# Altium PCB IndoorGuide_Tag_Device_V1.0.0.PcbDoc (part 1 of 2)
Units mil, origin at the board's own origin, x right, y up, seen from the top; angles counter-clockwise.
Board outline 2362.2 x 3661.42 mil, 4 copper layers (Top Layer, Ground, Power, Bottom Layer), stack 62.449 mil thick; 137 components, 86 nets, 438 pads, 206 vias.
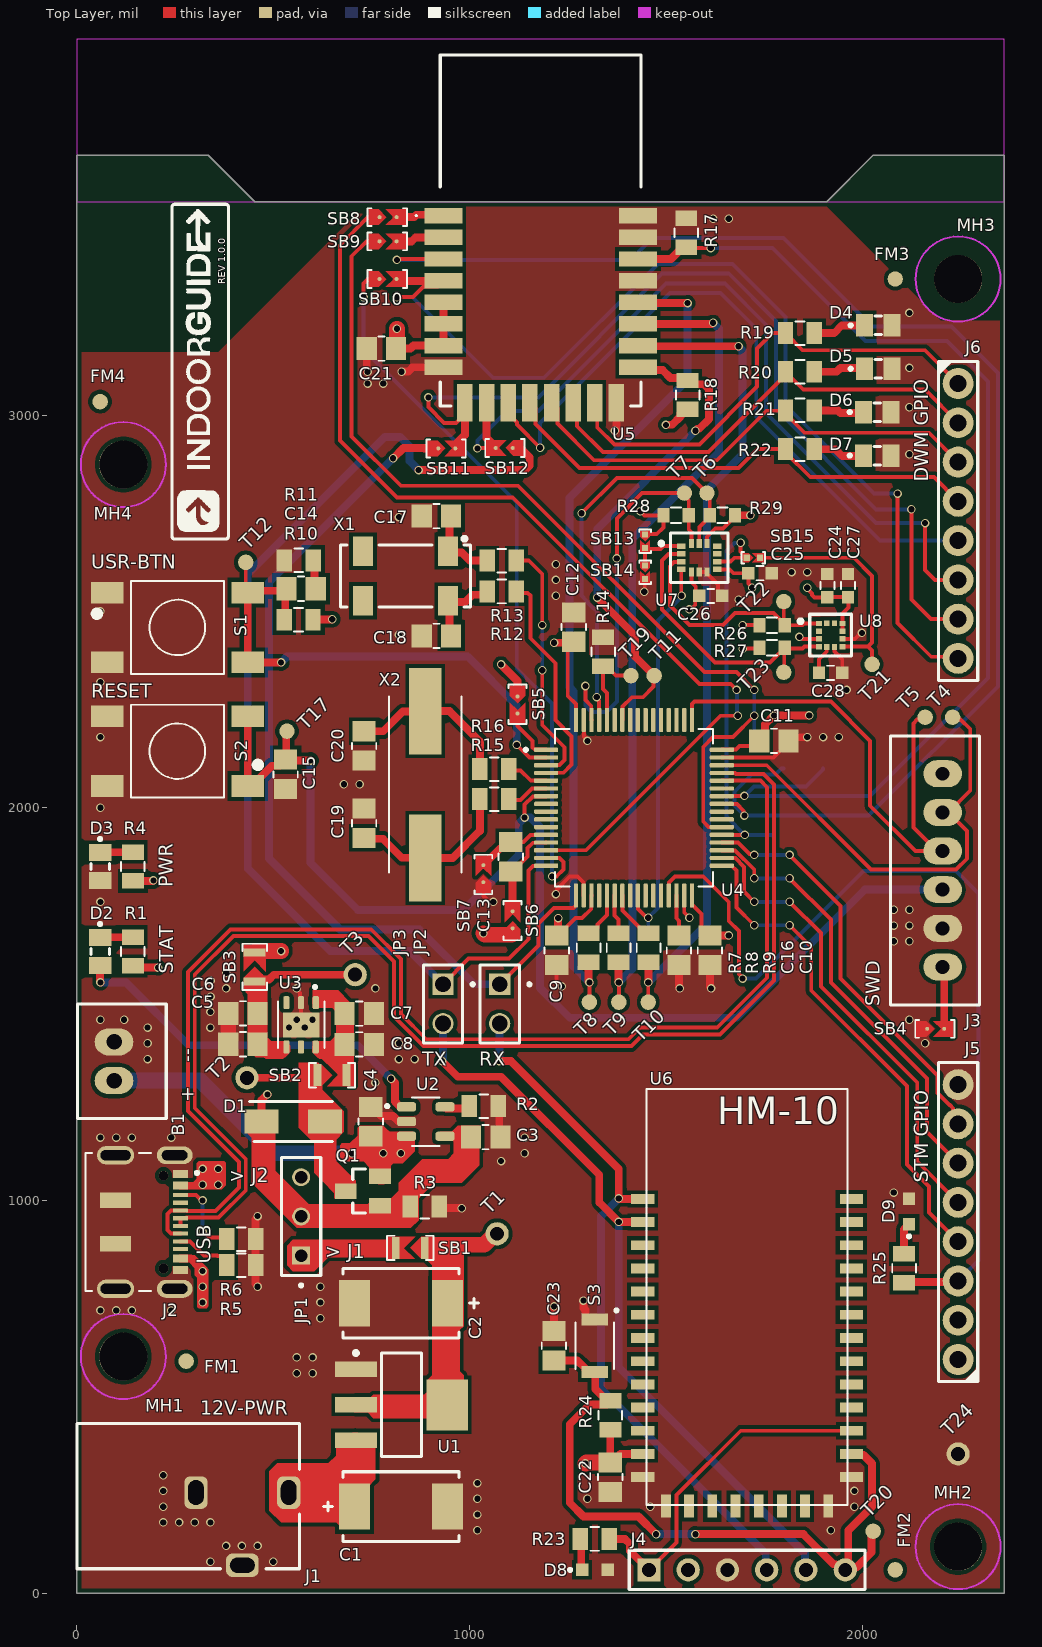
[diagram p0: Top Layer view]
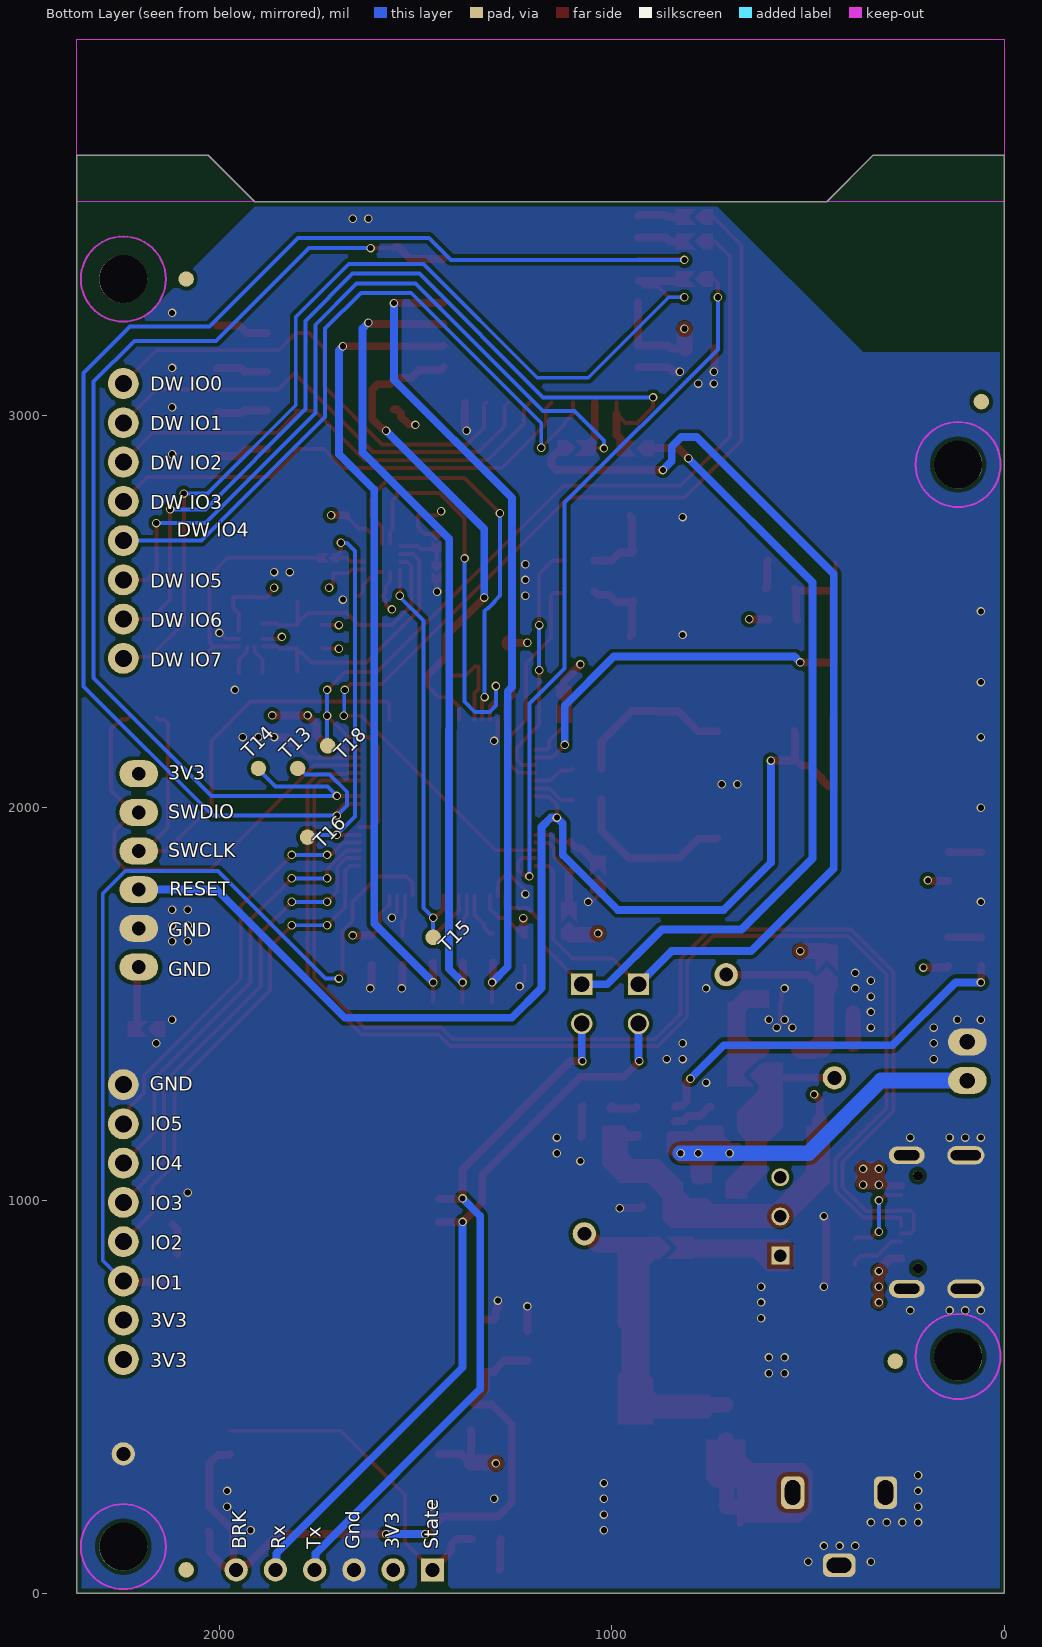
[diagram p1: Bottom Layer view, seen from below]
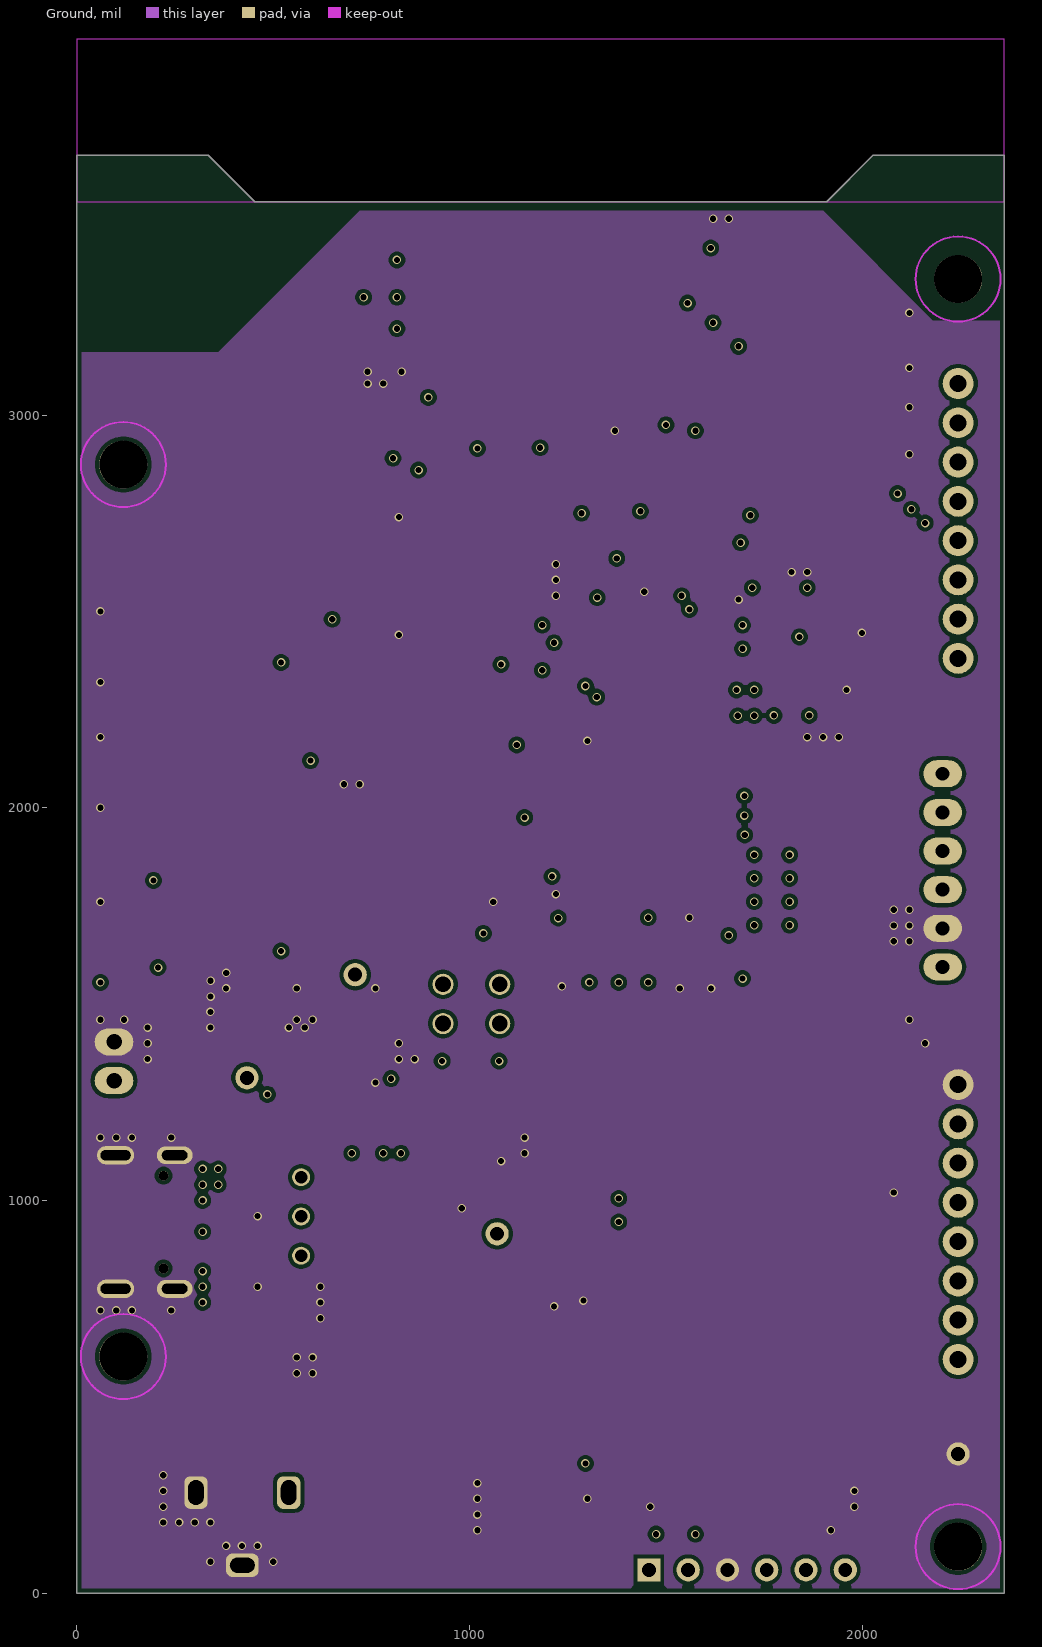
[diagram p2: Ground]
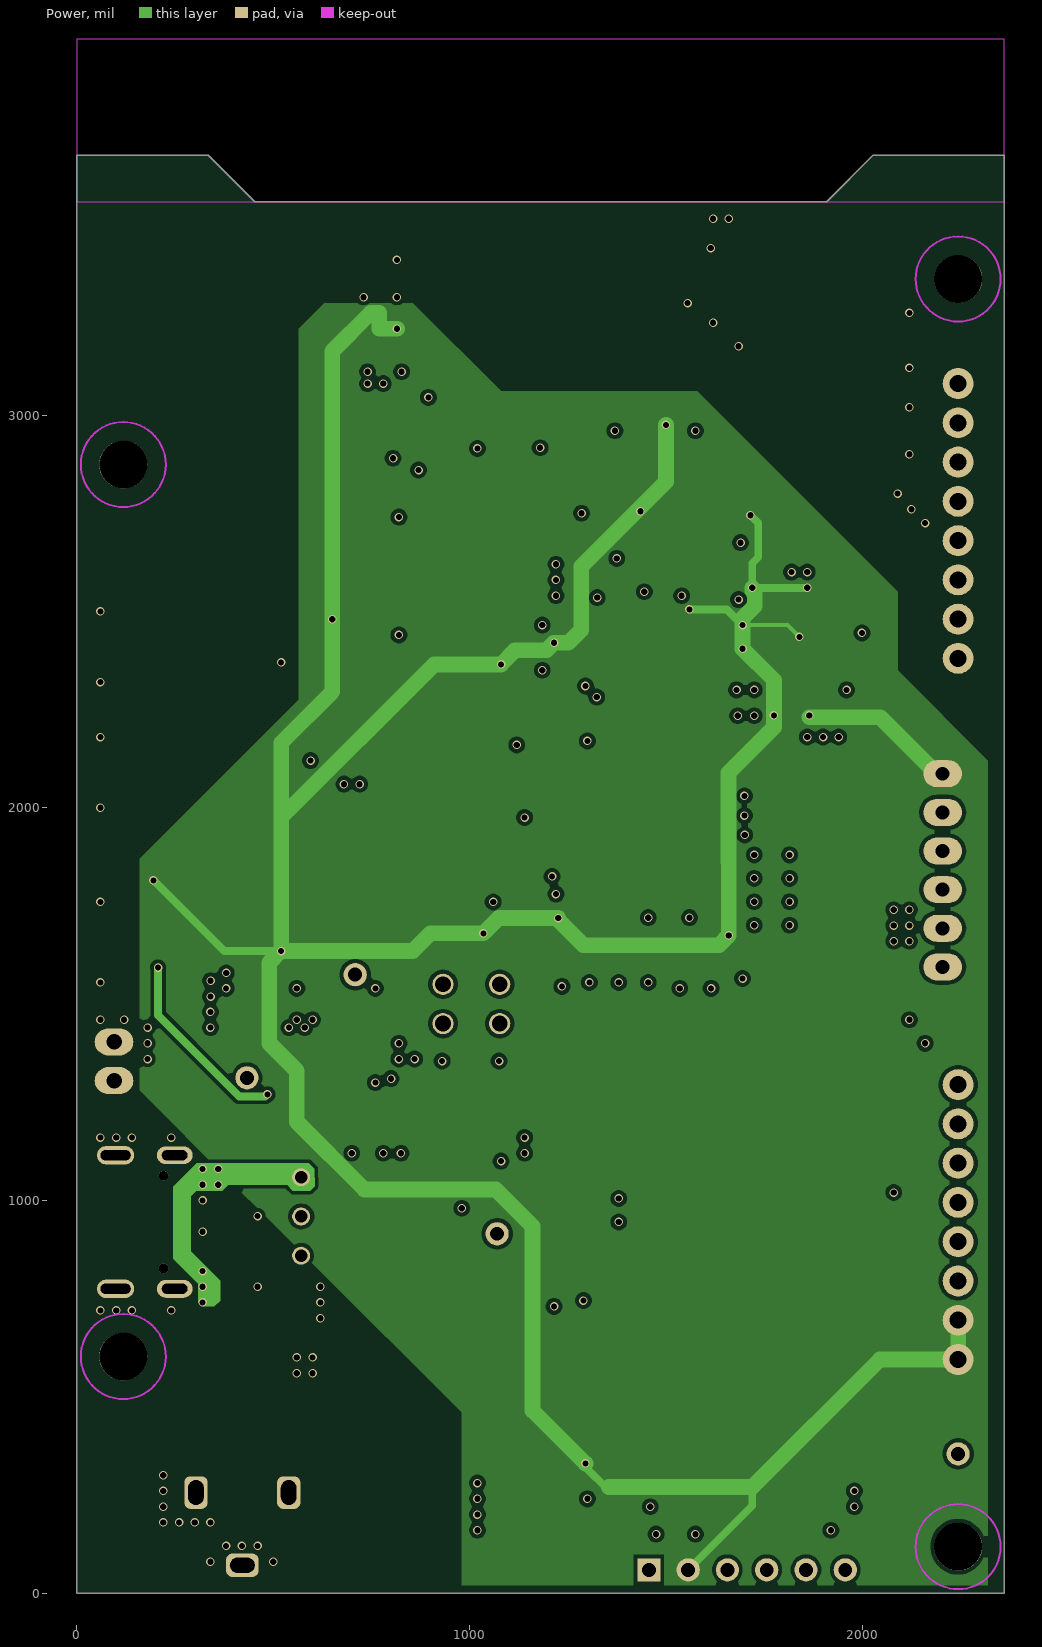
[diagram p3: Power]
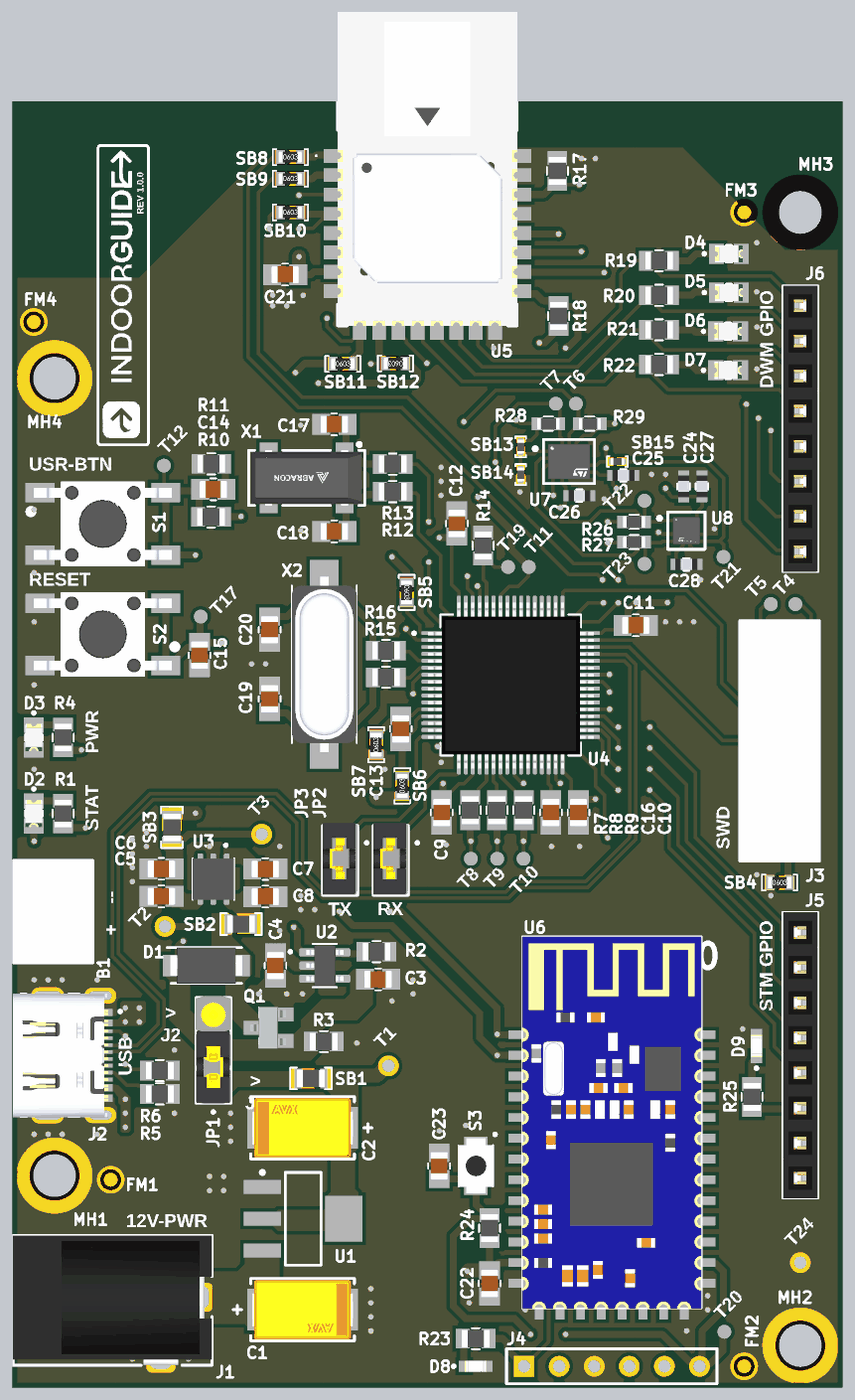
[diagram p5: 3D render of the assembled board from above, using the file's embedded part models]

## Layer stack, top to bottom
Top Solder: solder mask 1.2, Solder Resist, Dk 3.8
Top Layer: signal copper 1.378
Prepreg 1: prepreg 8.284, PP-7628, Dk 4.4
Ground: signal copper 0.598
Core: core 41.929, FR-4, Dk 4.6
Power: signal copper 0.598
Prepreg 2: prepreg 8.284, PP-7628, Dk 4.4
Bottom Layer: signal copper 1.378
Bottom Solder: solder mask 1.2, Solder Resist, Dk 3.8

## Board outline
0,0 0,3661.42 334.65,3661.42 452.76,3543.31 1909.45,3543.31 2027.56,3661.42 2362.2,3661.42 2362.2,0

## Design rules (kind name [scope] priority, off if disabled: settings)
BoardOutlineClearance [All] p1: gap=0 ignorepadtopadclearanceinfootprint=FALSE except(10: Track-SplitBarrior Fill-SplitBarrior Poly-SplitBarrior Region-SplitBarrior; 12: Track-OutlineEdge Track-CavityEdge Track-CutoutEdge Fill-OutlineEdge Fill-CavityEdge Fill-CutoutEdge Poly-OutlineEdge Poly-CavityEdge Poly-CutoutEdge Region-OutlineEdge Region-CavityEdge Region-CutoutEdge)
Clearance [All] p1: gap=10 ignorepadtopadclearanceinfootprint=TRUE except(0: Arc-Text Track-Text SMDPad-Text THPad-Text Via-Text Fill-Text Poly-Text Region-Text Text-Text; 3.5: Arc-Arc Arc-Track Track-Track; 5: Arc-Hole Track-Hole SMDPad-SMDPad SMDPad-Via SMDPad-Hole THPad-Via THPad-Hole Via-Hole Fill-Hole Poly-Hole Region-Hole Text-Hole; 7: Arc-SMDPad Arc-THPad Track-SMDPad Track-THPad; 20: SMDPad-THPad THPad-THPad)
ComponentClearance [All] p1: gap=0 collisioncheckmode=3 verticalgap=10 showdistances=FALSE
DiffPairsRouting DiffPairsRouting_1 [InDifferentialPairClass('DEBUG_USB_D')] p1: maxlimit=7.16 minlimit=5 mostfreqgap=5 toplayer_mingap=7.16 toplayer_prefgap=7.16 toplayer_minwidth=10 toplayer_maxwidth=10 toplayer_prefwidth=10 midlayer1_maxgap=5 midlayer1_minwidth=5.13 midlayer1_maxwidth=5.13 midlayer1_prefwidth=5.13 midlayer2_maxgap=5 midlayer2_minwidth=5.09 midlayer2_maxwidth=5.09 midlayer2_prefwidth=5.09 bottomlayer_maxgap=5 bottomlayer_minwidth=6.36 bottomlayer_maxwidth=6.36 bottomlayer_prefwidth=6.36 impedanceprofiledriven=TRUE impedanceprofileid={AF5FA480-CEEE-4C12-B6A5-884B5D8B32A9} impedanceprofilevalue=90.000000 maxuncoupledlength=500
DiffPairsRouting [All] p2: maxlimit=10 minlimit=5 mostfreqgap=5 toplayer_mingap=10 toplayer_prefgap=10 toplayer_minwidth=11.86 toplayer_maxwidth=11.86 toplayer_prefwidth=11.86 midlayer1_maxgap=5 midlayer1_minwidth=5.13 midlayer1_maxwidth=5.13 midlayer1_prefwidth=5.13 midlayer2_maxgap=5 midlayer2_minwidth=5.09 midlayer2_maxwidth=5.09 midlayer2_prefwidth=5.09 bottomlayer_maxgap=5 bottomlayer_minwidth=6.36 bottomlayer_maxwidth=6.36 bottomlayer_prefwidth=6.36 maxuncoupledlength=500
Height [All] p1: minheight=0 maxheight=2000 prefheight=500
HoleSize [All] p1: absolutevalues=TRUE maxlimit=248.03 minlimit=1 maxpercent=80.000 minpercent=20.000
MatchedLengths [InDifferentialPairClass('DEBUG_USB_D')] p1: tolerance=1000 checknetsindiffpair=FALSE checkdiffpairvsdiffpair=TRUE checkxsignals=TRUE checkothers=TRUE
MinimumAnnularRing MinimumAnnularRing_1 [IsVia] p1: minimumring=2.91
MinimumAnnularRing [All] p2: minimumring=5.12
MinimumSolderMaskSliver [All] p1: minsoldermaskwidth=0.59
PlaneConnect [All] p1: planeconnectstyle=Direct reliefexpansion=20 reliefentries=4 reliefconductorwidth=10 reliefairgap=10
PolygonConnect [All] p1: connectstyle=Direct reliefconductorwidth=10 reliefentries=4 polygonreliefangle="90 Angle" airgapwidth=10
RoutingVias [All] p1: holewidth=15.75 width=21.65 viastyle="Through Hole" minholewidth=11.81 minwidth=17.72 maxholewidth=15.75 maxwidth=21.65
SilkToSilkClearance [All] p1: silktosilkclearance=0
SilkToSolderMaskClearance [IsPad] p1: minsilkscreentomaskgap=0 clearancetoexposedcopper=TRUE
SolderMaskExpansion [IsVia] p1: expansion=4 istentingtop=FALSE
ViasUnderSMD [All] p1: allowed=TRUE
Width [All] p1: maxlimit=40 minlimit=10 preferedwidth=20
22 further rules are at their usual default settings.

## Classes and differential pairs
differential pair class DEBUG_USB_D: DEBUG_USB_D
net class N000-1_[1..5]: MCU_GPIO1 MCU_GPIO2 MCU_GPIO3 MCU_GPIO4 MCU_GPIO5
net class DW_GPIO[0..7]: DW_GPIO0 DW_GPIO1 DW_GPIO2 DW_GPIO3 DW_GPIO4 DW_GPIO5 DW_GPIO6 DW_GPIO7
component class Power: B1 C1 C2 C3 C4 C5 C6 C7 C8 D1 D2 D3 J1 J2 JP1 Q1 R1 R2 R3 R4 R5 R6 SB1 SB2 SB3 T1 T2 T3 U1 U2 U3
component class Mechanical_HW: FM1 FM2 FM3 FM4 MH1 MH2 MH3 MH4 T24
component class MCU: C9 C10 C11 C12 C13 C14 C15 C16 C17 C18 C19 C20 J3 R7 R8 R9 R10 R11 R12 R13 R14 R15 R16 S1 S2 SB4 SB5 SB6 SB7 T4 T5 T6 T7 T8 T9 T10 T11 T12 T13 T14 T15 T16 T17 T18 T19 U4 X1 X2
component class IMU: C24 C25 C26 C27 C28 R26 R27 R28 R29 SB13 SB14 SB15 T21 T22 T23 U7 U8
component class GPIO: D9 J5 J6 R25
component class DWM3000: C21 D4 D5 D6 D7 R17 R18 R19 R20 R21 R22 SB8 SB9 SB10 SB11 SB12 U5
component class BLE: C22 C23 D8 J4 JP2 JP3 R23 R24 S3 T20 U6
differential pair DEBUG_USB_D: +DEBUG_USB_D_P -DEBUG_USB_D_N

## Components (designator, comment, footprint, x,y, rotation, side; value= is the part's Value field where it differs from the comment)
B1 "" "JST XH B2B-XH-A" 94.49,1354.33 r90 top locked
C1 "10uF/50V" FP-TAJD-MFG 825.24,220.43 r0 top
C2 "10uF/50V" FP-TAJD-MFG 825.24,738.48 r180 top
C3 "4.7uF" cap0805 1040.8,1161.42 r180 top
C4 "4.7uF" cap0805 748.03,1200.79 r270 top
C5 "1uF" cap0805 422.78,1397.78 r0 top
C6 "100nF" cap0805 422.78,1476.18 r0 top
C7 "1uF" cap0805 718.95,1475.71 r180 top
C8 "100nF" cap0805 718.95,1397.3 r180 top
C9 "100nF" cap0805 1221.82,1636.86 r90 top
C10 "100nF" cap0805 1611.84,1636.86 r90 top
C11 "100nF" cap0805 1775,2170 r180 top
C12 "100nF" cap0805 1265,2460 r270 top
C13 "100nF" cap0805 1105,1875 r270 top
C14 "100nF" cap0805 570.87,2557.48 r0 top
C15 "100nF" cap0805 531.5,2085.04 r90 top
C16 "4.7uF" cap0805 1533.1,1636.86 r90 top
C17 "4.3pF" cap0805 915.55,2742.55 r0 top
C18 "4.3pF" cap0805 915.55,2437.6 r0 top
C19 "20pF" cap0805 731.3,1960.54 r270 top
C20 "20pF" cap0805 731.3,2157.39 r90 top
C21 "10uF/10V" cap0805 775.49,3169.29 r180 top
C22 "100nF" cap0805 1358.27,295.28 r90 top
C23 "100nF" cap0805 1214.65,629.92 r90 top
C24 "100nF" cap0603 1911.18,2565.85 r90 top
C25 "100nF" cap0603 1739.51,2597.17 r0 top
C26 "100nF" cap0603 1614.17,2539.37 r0 top
C27 "100nF" cap0603 1963.58,2565.85 r90 top
C28 "220nF" cap0603 1919.45,2343.52 r180 top
D1 "STPS2L30A" DIOM5126X265N 551.18,1200.79 r0 top
D2 "RED" LED0805 59.06,1633.86 r90 top
D3 "GREEN" LED0805 59.06,1850.39 r90 top
D4 "BLUE" LED0805 2040.51,3228.35 r180 top
D5 "ORANGE" LED0805 2040.51,3117.94 r180 top
D6 "GREEN" LED0805 2038.19,3007.54 r180 top
D7 "RED" LED0805 2038.19,2896.82 r180 top
D8 "BLUE" LED0603 1318.9,59.06 r180 top
D9 "BLUE" LED0603 2119.05,971.46 r270 top
FM1 "FM" FM 278.26,590.55 r0 top
FM2 "FM" FM 2083.95,59.06 r90 top
FM3 "FM" FM 2083.95,3346.46 r90 top
FM4 "FM" FM 59.06,3034.16 r90 top
J1 "" PJ-102AH 283.46,255.91 r90 top locked
J2 "DX07S016JA1R1500" JAE_DX07S016JA1R1500 220.47,944.88 r270 top locked
J3 "" "JST XH B6B-XH-A" 2204.72,1840.55 r270 top
J4 "" HDR1X6 1456.69,59.06 r0 top
J5 "" HEADER_FEMALE_8POS_P2.54MM 2244.09,944.88 r180 top
J6 "" HEADER_FEMALE_8POS_P2.54MM 2244.09,2730.32 r0 top
JP1 "3 Pin Jumper" SAMTEC_TS-103-T-A-1 570.87,959.11 r90 top
JP2 "2 Pin Jumper_Series" SAMTEC_HTSW-101-07-S-D 1076.59,1500.31 r180 top
JP3 "2 Pin Jumper_Series" SAMTEC_HTSW-101-07-S-D 932.29,1500.31 r180 top
MH1 "MH_7.4MMC_3.2MMD" MECHANICAL_M3_NON_PLATED 118.11,602.36 r0 top locked
MH2 "MH_7.4MMC_3.2MMD" MECHANICAL_M3_NON_PLATED 2244.09,118.11 r0 top locked
MH3 "MH_7.4MMC_3.2MMD" MECHANICAL_M3_NON_PLATED 2244.09,3346.46 r0 top
MH4 "MH_7.4MMC_3.2MMD" MECHANICAL_M3_NON_PLATED 118.11,2874.02 r0 top locked
Q1 "DMP1045U-7" SOT23 728.35,1023.62 r90 top
R1 "470" RES0805 142.62,1633.86 r270 top
R2 "10k" RES0805 1036.02,1240.16 r180 top
R3 "10k - Rpull" RES0805 885.83,984.25 r180 top
R4 "220" RES0805 142.62,1850.39 r270 top
R5 "5.1k" RES0805 418.07,835.05 r180 top
R6 "5.1k" RES0805 418.07,901.46 r180 top
R7 "0" RES0805 1302.89,1643.35 r270 top
R8 "0" RES0805 1379.3,1643.35 r270 top
R9 "0" RES0805 1455.7,1643.35 r270 top
R10 "4.7k" RES0805 564.37,2478.74 r0 top
R11 "100" RES0805 565,2630 r180 top
R12 "0" RES0805 1082.25,2550.71 r180 top
R13 "0" RES0805 1082.25,2629.45 r0 top
R14 "10k" RES0805 1339.93,2397.09 r270 top
R15 "0" RES0805 1062.99,2021.93 r180 top
R16 "0" RES0805 1062.99,2098.33 r180 top
R17 "100k" RES0805 1551.71,3464.57 r270 top
R18 "10k" RES0805 1555.12,3051.18 r270 top
R19 "150" RES0805 1841.34,3208.66 r180 top
R20 "150" RES0805 1841.34,3110.24 r180 top
R21 "150" RES0805 1841.34,3011.81 r180 top
R22 "150" RES0805 1841.34,2913.07 r180 top
R23 "470" RES0805 1318.9,137.8 r180 top
R24 "1k" RES0805 1358.27,452.76 r270 top
R25 "150" RES0805 2106.3,826.77 r270 top
R26 "10k" res0603 1770.32,2464.63 r180 top
R27 "10k" res0603 1770.32,2407.28 r180 top
R28 "10k" res0603 1525.75,2744.55 r180 top
R29 "10k" res0603 1643.86,2744.55 r0 top
S1 "SPST-NO 4 PIN" SW_5-1437565-0 255.91,2459.06 r0 top
S2 "SPST-NO 4 PIN" SW_5-1437565-0 255.91,2144.09 r180 top
S3 "SPST-NO 4 PIN" SW_B3U-1000P 1318.9,629.92 r270 top
SB1 "SB_ON" SOLDER-BRIDGE_R0805-0R 849.02,879.15 r180 top
SB2 "SB_ON" SOLDER-BRIDGE_R0805-0R 649.61,1318.9 r0 top
SB3 "SB_ON" SOLDER-BRIDGE_R0805-0R 452.76,1594.49 r90 top
SB4 "SB_ON" SOLDER-BRIDGE_R0603-0R 2185.04,1437.01 r0 top
SB5 "SB_ON" SOLDER-BRIDGE_R0603-0R 1122.05,2263.78 r270 top
SB6 "SB_ON" SOLDER-BRIDGE_R0603-0R 1109.4,1712.6 r90 top
SB7 "SB_ON" SOLDER-BRIDGE_R0603-0R 1035,1830 r90 top
SB8 "SB_ON" SOLDER-BRIDGE_R0603-0R 790.34,3503.94 r0 top
SB9 "SB_ON" SOLDER-BRIDGE_R0603-0R 790.34,3442.35 r0 top
SB10 "SB_ON" SOLDER-BRIDGE_R0603-0R 790.34,3346.46 r0 top
SB11 "SB_ON" SOLDER-BRIDGE_R0603-0R 940,2915 r0 top
SB12 "SB_ON" SOLDER-BRIDGE_R0603-0R 1090,2916.13 r180 top
SB13 "SB_ON" SOLDER-BRIDGE_R0402-0R 1447.01,2678.58 r270 top
SB14 "SB_ON" SOLDER-BRIDGE_R0402-0R 1447.01,2599.5 r270 top
SB15 "SB_ON" SOLDER-BRIDGE_R0402-0R 1722.6,2636.57 r0 top
T1 "TP" tp 1070,915 r0 top
T2 "TP" tp 433.07,1312.24 r0 top
T3 "TP" tp 708.66,1574.8 r90 top
T4 "TP" TP-Top 2230,2230.39 r0 top
T5 "TP" TP-Top 2160,2230.39 r270 top
T6 "TP" TP-Top 1604.49,2801.44 r0 top
T7 "TP" TP-Top 1547.11,2801.44 r0 top
T8 "TP" TP-Top 1305,1505 r0 top
T9 "TP" TP-Top 1380,1505 r0 top
T10 "TP" TP-Top 1455,1505 r90 top
T11 "TP" TP-Top 1470.12,2336.26 r90 top
T12 "TP" TP-Top 430,2625 r90 top
T13 "TP" TP-Top 1800,2100 r90 bottom
T14 "TP" TP-Top 1900,2100 r90 bottom
T15 "TP" TP-Top 1455,1670 r90 bottom
T16 "TP" TP-Top 1775,1925 r90 bottom
T17 "TP" TP-Top 535,2195 r90 top
T18 "TP" TP-Top 1723.59,2157.62 r90 bottom
T19 "TP" TP-Top 1411.06,2336.26 r90 top
T20 "TP" TP-Top 2027.56,157.48 r90 top
T21 "TP" TP-Top 2025,2365 r180 top
T22 "TP" TP-Top 1800,2525 r180 top
T23 "TP" TP-Top 1800,2345 r180 top
T24 "TP" tp 2244.09,354.33 r90 top
U1 "LD1117S50TR" SOT-223_M 826.77,479.46 r0 top
U2 "MCP73831T-2ATI/OT" SOT95P280X145-5N 888.54,1200.79 r0 top
U3 "LD39050PU33R" SON95P300X300X100-7N 570.87,1447.08 r270 top
U4 "STM32F446RET6" QFP50P1200X1200X160-64N 1418.67,1999.91 r0 top
U5 "DWM3000" DWM3000 1181.1,3470.28 r0 top locked
U6 "HM-10" 26.9X13X2.2_BOARD 1736.22,1003.94 r0 top locked
U7 "LSM6DSRTR" FP-LGA-14L-DM00249496-MFG 1584.8,2636.54 r0 top
U8 "LIS2MDLTR" FP-LGA-12-DM00170568-MFG 1919.45,2439.69 r0 top
X1 "ABS25-32.768KHZ-6-1-T" FP-ABS25-MFG 836.81,2590.08 r180 top
X2 "ABLS-8.000MHZ-B2-T" XTAL_ABLS-8.000MHZ-B2-T 887.17,2058.96 r90 top

## Footprints (in the part's own frame and the unit in brackets; to place one, negate y for a bottom-side part, rotate by r counter-clockwise, add the part's x,y. Pads: shape width x height; smd on the part's side, far side on the other; paste and mask are expansions set on the pad)
26.9X13X2.2_BOARD [mm]
  rect 1.5x0.635 smd: 1(-7.5,0) 2(-7.5,-1.5) 3(-7.5,-3) 4(-7.5,-4.5) 5(-7.5,-6) 6(-7.5,-7.5) 7(-7.5,-9) 8(-7.5,-10.5) 9(-7.5,-12) 10(-7.5,-13.5) 11(-7.5,-15) 12(-7.5,-16.5) 13(-7.5,-18) 22(6,-18) 23(6,-16.5) 24(6,-15) 25(6,-13.5) 26(6,-12) 27(6,-10.5) 28(6,-9) 29(6,-7.5) 30(6,-6) 31(6,-4.5) 32(6,-3) 33(6,-1.5) 34(6,0)
  rect 0.635x1.5 smd: 14(-6,-19.875) 15(-4.5,-19.875) 16(-3,-19.875) 17(-1.5,-19.875) 18(0,-19.875) 19(1.5,-19.875) 20(3,-19.875) 21(4.5,-19.875)
  silkscreen extent -7.25,-19.8 5.75,7.1, body extent -7.26,-19.81 5.74,7.09, height 2.2
cap0603 [mm]
  rect 0.8x0.8 smd: 1(-0.75,0) 2(0.75,0)
  silkscreen extent -0.23,-0.46 0.23,0.46, body extent -0.8,-0.4 0.8,0.4, height 0.81
cap0805 [mm]
  rect 1.3x1.5 smd: 1(-0.95,0) 2(0.95,0)
  silkscreen extent -0.2,-0.79 0.2,0.79, body extent -1,-0.62 1,0.63, height 1.46
DIOM5126X265N [mm]
  rect 2.2x1.55 smd: 1(-2.05,0) 2(2.05,0)
  silkscreen extent -2.83,-1.29 2.54,1.29, body extent -2.6,-1.3 2.6,1.3, height 1.1
DWM3000 [mm]
  rect 2.45x1 smd: 1(-6.295,0.95) 2(-6.295,-0.45) 3(-6.295,-1.85) 4(-6.295,-3.25) 5(-6.295,-4.65) 6(-6.295,-6.05) 7(-6.295,-7.45) 8(-6.295,-8.85) 17(6.295,-8.85) 18(6.295,-7.45) 19(6.295,-6.05) 20(6.295,-4.65) 21(6.295,-3.25) 22(6.295,-1.85) 23(6.295,-0.45) 24(6.295,0.95)
  rect 1x2.45 smd: 9(-4.9,-11.145) 10(-3.5,-11.145) 11(-2.1,-11.145) 12(-0.7,-11.145) 13(0.7,-11.145) 14(2.1,-11.145) 15(3.5,-11.145) 16(4.9,-11.145)
  silkscreen extent -8.1,-11.35 6.5,11.35, body extent -6.5,-11.35 6.5,11.35, height 2.89
FM [mm]
  round 1 / inner round 0 / far side round 1 all layers, no hole mask+0.5: 0(0,0)
FP-ABS25-MFG [mm]
  rect 1.3x1.9 smd paste+0 mask+0: 1(-2.75,-1.6) 2(2.75,-1.6) 3(2.75,1.6) 4(-2.75,1.6)
  silkscreen extent -4.2,-2.54 4.2,2, body extent -4.3,-2.65 4.3,2.65, height 0.25
FP-LGA-12-DM00170568-MFG [mm]
  rect 0.375x0.35 smd paste+0 mask+0: 1(-0.763,0.75) 2(-0.763,0.25) 3(-0.763,-0.25) 4(-0.763,-0.75) 7(0.763,-0.75) 8(0.763,-0.25) 9(0.763,0.25) 10(0.763,0.75)
  rect 0.35x0.375 smd paste+0 mask+0: 5(-0.25,-0.763) 6(0.25,-0.763) 11(0.25,0.763) 12(-0.25,0.763)
  silkscreen extent -2.07,-1.35 1.35,1.35, body extent -1.55,-1.55 1.55,1.55, height 0.25
FP-LGA-14L-DM00249496-MFG [mm]
  rect 0.575x0.35 smd paste-1000 mask+0: 1(-1.162,0.75) 2(-1.162,0.25) 3(-1.162,-0.25) 4(-1.162,-0.75) 8(1.162,-0.75) 9(1.162,-0.25) 10(1.162,0.25) 11(1.162,0.75)
  rect 0.35x0.575 smd paste-1000 mask+0: 5(-0.5,-0.913) 6(0,-0.913) 7(0.5,-0.913) 12(0.5,0.913) 13(0,0.913) 14(-0.5,0.913)
  silkscreen extent -2.57,-1.6 1.85,1.6, body extent -2.05,-1.8 2.05,1.8, height 0.25
FP-TAJD-MFG [mm]
  rect 2x3 smd paste+0 mask+0: 1(-3,0) 2(3,0)
  silkscreen extent -5.02,-2.25 3.75,2.25, body extent -4.1,-2.35 4.1,2.35, height 0.25
HDR1X6 [mm] "Connector; Header; 6 Position"
  rect 1.5x1.5 hole 0.9: 1(0,0)
  round 1.5 hole 0.9: 2(2.54,0) 3(5.08,0) 4(7.62,0) 5(10.16,0) 6(12.7,0)
  silkscreen extent -1.27,-1.27 13.97,1.27
HEADER_FEMALE_8POS_P2.54MM [mm] "2.54mm DIL PC TAIL PIN HEADER ASSEMBLY"
  round 2 hole 1.1: 1(0,8.89) 2(0,6.35) 3(0,3.81) 4(0,1.27) 5(0,-1.27) 6(0,-3.81) 7(0,-6.35) 8(0,-8.89)
  silkscreen extent -1.27,-10.33 1.27,10.35, body extent -1.25,-10.36 1.25,10.36, height 8.5
JAE_DX07S016JA1R1500 [mm]
  rect 0.52x1 smd: 1(-3.1,1.1) 2(-2.35,1.1) 11(2.35,1.1) 12(3.1,1.1)
  rect 0.27x1 smd: 3(-1.75,1.1) 4(-1.25,1.1) 5(-0.75,1.1) 6(-0.25,1.1) 7(0.25,1.1) 8(0.75,1.1) 9(1.25,1.1) 10(1.75,1.1)
  rect 1x2 smd: S1(-1.4,-3.1) S2(1.4,-3.1)
  oval 1.158x2.316 hole 0.65 slot 1.65 at 90 deg: S3(-4.32,0.725) S4(4.32,0.725)
  oval 1.2x2.4 hole 0.65 slot 1.95 at 90 deg: S5(-4.32,-3.1) S6(4.32,-3.1)
  round 0.63 hole 0.63 unplated: ""(-3,0) ""(3,0)
  round 0.6 hole 0.6 unplated: ""(3,0)
  silkscreen extent -4.47,-5.05 4.47,2.26, body extent -4.47,-5.61 4.47,1.29, height 3.31
"JST XH B2B-XH-A" [mm]
  oval 1.75x2.5 hole 1: 1(-1.25,0) 2(1.25,0)
  silkscreen extent -3.7,-3.38 3.7,2.38, body extent -3.7,-3.38 3.7,2.38, height 7
"JST XH B6B-XH-A" [mm]
  oval 1.75x2.5 hole 0.9: 1(-6.25,0) 2(-3.75,0) 3(-1.25,0) 4(1.25,0) 5(3.75,0) 6(6.25,0)
  silkscreen extent -8.7,-3.38 8.7,2.38, body extent -8.7,-3.38 8.7,2.38, height 7
LED0603 [mm]
  rect 0.8x0.8 smd: 1(0.825,0) 2(-0.825,0)
  silkscreen extent 1.5,-0.1 1.7,0.1, body extent -0.8,-0.4 0.8,0.4, height 1.1
LED0805 [mm]
  rect 1.1x1.45 smd: 1(0.9,0) 2(-0.9,0)
  silkscreen extent -0.2,-0.6 1.88,0.6, body extent -1,-0.63 1,0.63, height 0.7
MECHANICAL_M3_NON_PLATED [mm] "MECHANICAL_M3_NON_PLATED"
  round 3.1 hole 3.1 unplated mask+1.2: 1(0,0)
  Keep-Out Layer circle w0.127: c0,0 r2.75
PJ-102AH [mm] "DC Barrel Jack W/ Switch 2.0x5.5"
  rrect50% 2.1x1.5 hole 1 slot 1.6 at 0 deg: 1(0,-6.5) 2(0,-0.5)
  rrect50% 1.5x2.1 hole 1 slot 1.6 at 90 deg: 3(-4.7,-3.5)
  silkscreen extent -4.92,-7.2 4.47,7.2, body extent -4.92,-7.2 4.47,7.2, height 11
QFP50P1200X1200X160-64N [mm]
  rrect50% 1.56x0.28 smd: 1(-5.68,3.75) 2(-5.68,3.25) 3(-5.68,2.75) 4(-5.68,2.25) 5(-5.68,1.75) 6(-5.68,1.25) 7(-5.68,0.75) 8(-5.68,0.25) 9(-5.68,-0.25) 10(-5.68,-0.75) 11(-5.68,-1.25) 12(-5.68,-1.75) 13(-5.68,-2.25) 14(-5.68,-2.75) 15(-5.68,-3.25) 16(-5.68,-3.75) 33(5.68,-3.75) 34(5.68,-3.25) 35(5.68,-2.75) 36(5.68,-2.25) 37(5.68,-1.75) 38(5.68,-1.25) 39(5.68,-0.75) 40(5.68,-0.25) 41(5.68,0.25) 42(5.68,0.75) 43(5.68,1.25) 44(5.68,1.75) 45(5.68,2.25) 46(5.68,2.75) 47(5.68,3.25) 48(5.68,3.75)
  rrect50% 0.28x1.56 smd: 17(-3.75,-5.68) 18(-3.25,-5.68) 19(-2.75,-5.68) 20(-2.25,-5.68) 21(-1.75,-5.68) 22(-1.25,-5.68) 23(-0.75,-5.68) 24(-0.25,-5.68) 25(0.25,-5.68) 26(0.75,-5.68) 27(1.25,-5.68) 28(1.75,-5.68) 29(2.25,-5.68) 30(2.75,-5.68) 31(3.25,-5.68) 32(3.75,-5.68) 49(3.75,5.68) 50(3.25,5.68) 51(2.75,5.68) 52(2.25,5.68) 53(1.75,5.68) 54(1.25,5.68) 55(0.75,5.68) 56(0.25,5.68) 57(-0.25,5.68) 58(-0.75,5.68) 59(-1.25,5.68) 60(-1.75,5.68) 61(-2.25,5.68) 62(-2.75,5.68) 63(-3.25,5.68) 64(-3.75,5.68)
  silkscreen extent -7.1,-5.1 5.1,5.1, body extent -6,-6.03 6,5.97, height 1.48
res0603 [mm]
  rect 0.79x0.93 smd: 1(-0.82,0) 2(0.82,0)
  silkscreen extent -0.33,-0.51 0.33,0.51, body extent -0.8,-0.4 0.8,0.4, height 0.45
RES0805 [mm]
  rect 1x1.42 smd: 1(-0.935,0) 2(0.935,0)
  silkscreen extent -0.28,-0.76 0.28,0.76, body extent -1,-0.63 1,0.63, height 0.6
SAMTEC_HTSW-101-07-S-D [mm]
  rect 1.37x1.37 / inner round 1.37 / far side rect 1.37x1.37 hole 1.02: 1(0,-1.27)
  round 1.37 hole 1.02: 2(0,1.27)
  silkscreen extent -2.02,-2.51 1.27,2.51, body extent -1.27,-2.73 1.27,2.47, height 8.5
SAMTEC_TS-103-T-A-1 [mil]
  rect 45.78x45.78 / inner round 45.78 / far side rect 45.78x45.78 hole 32: 1(-100,0)
  round 45.78 hole 32: 2(0,0) 3(100,0)
  silkscreen extent -180,-50 150,50, body extent -153,-50 155,50, height 335
SOLDER-BRIDGE_R0402-0R [mm]
  rect 0.4x0.4 smd mask+0: 1(-0.432,0) 2(0.432,0)
  Top Layer region: -0.076,0.305 0.229,0 -0.076,-0.305 0.686,-0.305 0.686,0.305
  Top Layer region: 0,0 -0.305,0.305 -0.686,0.305 -0.686,-0.305 -0.305,-0.305
  silkscreen extent -0.76,-0.38 0.76,0.38, body extent -0.5,-0.25 0.5,0.25, height 0.35
SOLDER-BRIDGE_R0603-0R [mil]
  round 10 smd paste-393.7 mask+4: 1(-19.68,0) 2(23.62,0)
  Top Layer region: -47.24,-19.68 -47.24,19.68 -21.68,19.68 -2,0 -21.69,-19.69
  Top Layer region: -3.68,19.68 16,0 -3.68,-19.68 47.24,-19.68 47.24,19.68
  silkscreen extent -50,-23 50,23, body extent -36,-20 36,20, height 22
SOLDER-BRIDGE_R0805-0R [mm]
  rect 0.5x1.42 smd mask+0: 1(-0.935,0) 2(0.935,0)
  Top Layer region: -0.279,0.711 0.419,0.013 -0.305,-0.711 1.422,-0.711 1.422,0.711
  Top Layer region: 0,0 -0.711,0.711 -1.422,0.711 -1.422,-0.711 -0.711,-0.711
  silkscreen extent -1.5,-0.79 1.5,0.79, body extent -1,-0.63 1,0.63, height 0.6
SON95P300X300X100-7N [mm]
  rrect50% 0.84x0.4 smd: 1(-1.435,0.95) 2(-1.435,0) 3(-1.435,-0.95) 4(1.435,-0.95) 5(1.435,0) 6(1.435,0.95)
  rect 1.625x2.365 smd paste-2: 7(0,0)
  silkscreen extent -2.55,-1.5 1.5,1.5, body extent -1.5,-1.5 1.5,1.5, height 1.02
SOT23 [mm]
  rect 1x1.4 smd: 1(-0.95,-1.1) 2(0.95,-1.1) 3(0,1.1)
  silkscreen extent -1.42,-0.15 1.42,0.66, body extent -1.52,-1.27 1.52,1.33, height 1.3
SOT95P280X145-5N [mm]
  rrect50% 1.22x0.6 smd: 1(-1.245,0.95) 2(-1.245,0) 3(-1.245,-0.95) 4(1.245,-0.95) 5(1.245,0.95)
  silkscreen extent -2.6,-1.57 0.88,1.57, body extent -1.35,-1.45 1.35,1.45, height 1.45
SOT-223_M [mm] "SOT223, 4-Leads, Body 6.5x3.5mm, Pitch 2.3mm, Lead Span 7mm, IPC Low Density"
  rect 2.7x1 smd: 1(-2.95,2.3) 2(-2.95,0) 3(-2.95,-2.3)
  rect 2.7x3.3 smd: 4(2.95,0)
  silkscreen extent -3.07,-3.35 1.3,3.47, body extent -1.85,-3.35 1.85,3.35, height 1.8
SW_5-1437565-0 [mm]
  rect 2.1x1.4 smd: 1(-4.55,2.25) 2(4.55,2.25) 3(4.55,-2.25) 4(-4.55,-2.25)
  silkscreen extent -5.41,-3 3,3, body extent -5,-3 5,3, height 7.26
SW_B3U-1000P [mm]
  rect 0.8x1.7 smd: 1(-1.7,0) 2(1.7,0)
  silkscreen extent -2.39,-1.25 1.5,1.5, body extent -2,-1.23 2,1.27, height 1.6
tp [mm]
  round 1.5 hole 0.9: 1(0,0)
TP-Top [mm]
  round 1 smd: 1(0,0)
XTAL_ABLS-8.000MHZ-B2-T [mm]
  rect 5.6x2.1 smd: 1(-4.75,0) 2(4.75,0)
  silkscreen extent -5.7,-2.35 5.7,2.35, body extent -6.35,-2.35 6.35,2.35, height 4.2

## Part data
B1: library part Battery_2, "BATTERY HOLDER 18650 PC PIN"
C1 C2: library part "Cap Pol", "10uF 50V 800mΩ@100kHz ±10% CASE-D-7343 Tantalum Capacitors ROHS", JLCPCB=C89596, MF=TAJD106K050RNJ
C3 C4 C16: library part Cap, "25V 4.7uF X5R ±10% 0805 Multilayer Ceramic Capacitors MLCC - SMD/SMT ROHS", JLCPCB=C1779, Voltage Rating=25V, MF="Samsung Electro-Mechanics", MP=CL21A475KAQNNNE
C5 C7: library part Cap, "25V 1uF X7R ±10% 0805 Multilayer Ceramic Capacitors MLCC - SMD/SMT ROHS", JLCPCB=C77080, Voltage Rating=25V, MF="Murata Electronics", MP=GRM21BR71E105KA99L
C6 C8 C22: library part Cap, "25V 100nF X7R ±10% 0805 Multilayer Ceramic Capacitors MLCC - SMD/SMT ROHS", JLCPCB=C519981, Voltage Rating=25V, MF=YAGEO, MP=CC0805KRX7R8BB104
C9 C10 C11 C12 C13 C14 C15 C23: library part Cap, "10V 100nF U2J ±5% 0805 Multilayer Ceramic Capacitors MLCC - SMD/SMT ROHS", JLCPCB=C710980, Voltage Rating=10V, MF="Murata Electronics", MP=GRM21B7U1A104JA01L
C17 C18: library part Cap, "50V 4.3pF NP0 0805 Multilayer Ceramic Capacitors MLCC - SMD/SMT ROHS", JLCPCB=C2201928, MF=YAGEO, MP=CC0805CRNPO9BN4R3
C19 C20: library part Cap, "50V 20pF C0G ±5% 0805 Multilayer Ceramic Capacitors MLCC - SMD/SMT ROHS", JLCPCB=C1798, MF="Samsung Electro-Mechanics", MP=CL21C200JBANNNC
C21: library part "Cap Pol", "10V 10uF X7R ±10% 0805 Multilayer Ceramic Capacitors MLCC - SMD/SMT ROHS", JLCPCB=C86038, MF="Murata Electronics", MP=GRM21BR71A106KE51L
C24 C25 C26 C27: library part Cap, "16V 100nF X7R ±10% 0603 Multilayer Ceramic Capacitors MLCC - SMD/SMT ROHS", JLCPCB=C45000, Voltage Rating=10V, MF="Murata Electronics", MP=GRM188R71C104KA01D
C28: library part Cap, "25V 220nF X7R ±10% 0603 Multilayer Ceramic Capacitors MLCC - SMD/SMT ROHS", JLCPCB=C106857, Voltage Rating=16V, MF=YAGEO, MP=CC0603KRX7R8BB224
D1: library part "D Schottky", "30V 450mV@2A 2A SMA(DO-214AC) Schottky Diodes ROHS", JLCPCB=C133102, MF=STMicroelectronics, MP=STPS2L30A
D2 D7: library part LED, "Light Emitting Diode", JLCPCB=C94741, MF="BrtLed(Bright LED Elec)", MP=BL-HUF35A-AV-TRB
D3 D6: library part LED, "Yellow Green 0805 LED Indication - Discrete ROHS", JLCPCB=C165984, MF="BrtLed(Bright LED Elec)", MP=BL-HGE35A-AV-TRB
D4 D5 D8 D9: library part LED, "Light Emitting Diode"
FM1 FM2 FM3 FM4: "Fiducial mark"
J1: library part Barrel_Connector, "CONN PWR JACK 2X5.5MM SOLDER"
J2: "USB-C (USB TYPE-C) USB 2.0 Receptacle Connector 24 (16+8 Dummy) Position Surface Mount, Right Angle; Through Hole", MP=DX07S016JA1R1500
J3 J4: library part "6 Pin", "CONN RCPT 6POS 0.1 GOLD PCB"
J5 J6: library part "8 Pin", "CONN RCPT 8POS 0.1 GOLD PCB"
JP1: Voltage Rating=300V
JP2 JP3: "2 Pin Jumper - place in series with wires.", Color=Black, Current Rating (Amps)=20A, Manufacturer="TE Connectivity AMP Connectors", Part Number=NC6-P108-03, Supplier Part Number 1=A98496-ND, Voltage Rating=300V, Barrier Type="2 Wall (Dual)", Bottom Termination="PC Pin", ComponentLink1Description=Datasheet, ComponentLink1URL=https://www.te.com/commerce/DocumentDelivery/DDEController?Action=srchrtrv&DocNm=3-1437664-0&DocType=Customer+Drawing&DocLang=English, ComponentLink2Description="DigiKey Link", ComponentLink2URL=http://digikey.com/product-detail/en/te-connectivity-amp-connectors/NC6-P108-03/A98496-ND/1277927, LastUpdated="1/15/2020 4:12:05 AM", Lifecycle Status=Active, Minimum Order=1, Number of Circuits=3, Number of Rows=1, Number of Wire Entries=3, Packaging=Bulk, Part Status=Active, Pitch="0.375\" (9.53mm)", Price=2.16, Series="NC6, Buchanan", Supplier 1=DigiKey, Terminal Block Type="Barrier Block", Top Termination="Screws with Captive Plate", Wire Gauge="12-22 AWG"
MH1 MH2 MH3 MH4: library part Mounting_Hole2, "Mounting Hole 7.4mm Diameter, 3.2mm Drill"
Q1: library part PMOS-2, "12V 4A 31mΩ@4.5V,4A 800mW 1V@250uA 1 Piece P-Channel SOT-23 MOSFETs ROHS", JLCPCB=C177033, MF="Diodes Incorporated", MP=DMP1045U-7
R1 R23: library part Res, "125mW Thick Film Resistors 150V ±100ppm/℃ ±1% 470Ω 0805 Chip Resistor - Surface Mount ROHS", JLCPCB=C17710, MF="UNI-ROYAL(Uniroyal Elec)", MP=0805W8F4700T5E
R2 R3 R14 R18: library part Res, "125mW Thick Film Resistors 150V ±100ppm/℃ ±1% 10kΩ 0805 Chip Resistor - Surface Mount ROHS", JLCPCB=C17414, MF="UNI-ROYAL(Uniroyal Elec)", MP=0805W8F1002T5E
R4: library part Res, "125mW Thick Film Resistors 150V ±100ppm/℃ ±1% 220Ω 0805 Chip Resistor - Surface Mount ROHS", JLCPCB=C17557, MF="UNI-ROYAL(Uniroyal Elec)", MP=0805W8F2200T5E
R5 R6: library part Res, "125mW Thick Film Resistors 150V ±100ppm/℃ ±5% 5.1kΩ 0805 Chip Resistor - Surface Mount ROHS", JLCPCB=C26023, MF="UNI-ROYAL(Uniroyal Elec)", MP=0805W8J0512T5E
R7 R8 R9 R12 R13 R15 R16: library part Res, "125mW Thick Film Resistors 150V ±800ppm/℃ ±1% 0Ω 0805 Chip Resistor - Surface Mount ROHS", JLCPCB=C17477, MF="UNI-ROYAL(Uniroyal Elec)", MP=0805W8F0000T5E
R10: library part Res, "125mW Thick Film Resistors 150V ±100ppm/℃ ±1% 4.7kΩ 0805 Chip Resistor - Surface Mount ROHS", JLCPCB=C17673, MF="UNI-ROYAL(Uniroyal Elec)", MP=0805W8F4701T5E
R11: library part Res, "125mW Thick Film Resistors 150V ±100ppm/℃ ±1% 100Ω 0805 Chip Resistor - Surface Mount ROHS", JLCPCB=C17408, MF="UNI-ROYAL(Uniroyal Elec)", MP=0805W8F1000T5E
R17: library part Res, "±1% 100kΩ 0805 Chip Resistor - Surface Mount ROHS", JLCPCB=C17407, MF="UNI-ROYAL(Uniroyal Elec)", MP=0805W8F1003T5E
R19 R20 R21 R22 R25: library part Res, "125mW Thick Film Resistors 150V ±100ppm/℃ ±1% 150Ω 0805 Chip Resistor - Surface Mount ROHS", JLCPCB=C17471, MF="UNI-ROYAL(Uniroyal Elec)", MP=0805W8F1500T5E
R24: library part Res, "Resistor", JLCPCB=C17513, MF="UNI-ROYAL(Uniroyal Elec)", MP=0805W8F1001T5E
R26 R27 R28 R29: library part Res, "100mW Thick Film Resistors 75V ±100ppm/℃ ±5% 10kΩ 0603 Chip Resistor - Surface Mount ROHS", JLCPCB=C15401, MF="UNI-ROYAL(Uniroyal Elec)", MP=0603WAJ0103T5E
S1 S2 S3: "Switch Push button"
SB1 SB2 SB3: "500mW 0Ω Current Sensing Resistors ±150ppm/℃ 0805 Current Sense Resistors / Shunt Resistors ROHS", JLCPCB=C2842889, MF="ROHM Semicon", MP=PMR10EZPJ000
SB4 SB5 SB6 SB7 SB8 SB9 SB10 SB11 SB12 SB13 SB14 SB15: "100mW Thick Film Resistors 75V ±5% ±800ppm/℃ 0Ω 0603 Chip Resistor - Surface Mount ROHS", JLCPCB=C15402, MF="UNI-ROYAL(Uniroyal Elec)", MP=0603WAJ0000T5E
T1 T2 T3 T4 T5 T6 T7 T8 T9 T10 T11 T12 T13 T14 T15 T16 T17 T18 T19 T20 T21 T22 T23 T24: "Test Point"
U1: library part CMP-0244-00312-1, "75dB@(120Hz) 800mA Fixed 5V Positive electrode 15V SOT-223-3 Voltage Regulators - Linear, Low Drop Out (LDO) Regulators ROHS", JLCPCB=C134077, MF=STMicroelectronics, MP=LD1117S50TR
U2: "6V Lithium-ion/Polymer 1 500mA SOT-23-5 Battery Management ROHS", JLCPCB=C14879, MF="Microchip Tech", MP=MCP73831T-2ATI/OT
U3: "500mA 65dB Fixed 3.3V Positive electrode 5.5V DFN-6(3x3) Voltage Regulators - Linear, Low Drop Out (LDO) Regulators ROHS", JLCPCB=C132827, MF=STMicroelectronics, MP=LD39050PU33R
U4: library part MC-ARM-STM32F446-LQFP64, "ARM Cortex-M4 32-bit MCU+FPU, 512 KB Flash, 128 KB Internal RAM, 50 I/Os, 64-Pin LQFP, -40 to 85 degC, Tray", I/Os (High Current)=50, Operating Frequency(F) (Processor speed) (MHz)=180, Package Description=LQFP64, Package Reference="64-Pin Low-profile Quad Flat Package, Body 10 x 10 mm, Pitch 0.5 mm", Supply Voltage(Vcc) min (V)=1.7, ComponentLink1Description="Manufacturer URL", ComponentLink1URL=http://www.st.com/, ComponentLink2Description=Datasheet, ComponentLink2URL=http://www.st.com/st-web-ui/static/active/en/resource/technical/document/datasheet/DM00141306.pdf, Core="ARM Cortex-M4", D/A Converter=2, DatasheetVersion="Rev. 6", FLASH Size (Prog) (kB)=512, Internal RAM Size (kB)=128, Mounting Technology="Surface Mount", Packing=Tray
U5: "RF Modules DWM3000 UWB XCVR Module", MF=Qorvo, MOUSER=772-DWM3000TR13, MP=DWM3000TR13
U6: "Bluetooth 4.0 module with 4pin base board that can support iphone4s or later."
U7: "INEMO INERTIAL MODULE: 3D ACCELE", MF=LSM6DSRTR
U8: "SENSOR MR I2C/SPI 12LGA", MF=LIS2MDLTR
X1: library part 28be33c29b20f54059194caee89ade4, "SMD,3.8x8.4mm Crystals ROHS", JLCPCB=C5369037, Manufacturer=Abracon, Manufacturer Part Number=ABS25-32.768KHZ-6-1-T, MF="Abracon LLC", MP=ABS25-32.768KHZ-6-1-T
X2: library part XTAL, "Crystals 8.0 MHZ 18PF 80 OHMAUTO", MF=ABRACON, MOUSER=815-ABLS-8-B2, MP=ABLS-8.000MHZ-B2-T

## Via types
v1: diameter 21.65, hole 15.75, Top Layer to Bottom Layer, tented both sides, 206 vias

## Nets (pads, with @x,y where several pads share a name; then routed paths per layer and width w, separated by ;. In a path a pad name is that pad's centre, name@x,y a point inside that pad or via, vN(x,y) a via of type N, cw(c..) or ccw(c..) an arc to the next point about the centre after c; other vN are vias at no path point)
+3V3: C9.2 C10.2 C11.2 C12.2 C21.1 C22.2 C24.1 C25.1 C26.1 C27.1 J3.1 J4.2 J5.1 J5.2 R4.2 R10.2 R18.2 R24.2 R26.2 R27.2 R28.2 R29.2 SB3.2 SB5.1 SB6.1 SB13.1 U4.19 U4.32 U4.48 U4.64 U5.5 U5.6 U5.7 U6.12 U7.5 U7.8 U7.12 U8.3 U8.9 U8.10 | length 13110.7
  Top Layer w10: C9.2@1221.82,1674.26 1225.75,1674.26 1270.15,1718.66 1286.08,1718.66 1309.89,1742.47 1309.89,1775.77 U4.19@1310.4,1776.29 ; C12.2@1265,2422.6 1250,2407.6 1250,2285 1271.03,2263.97 U4.64@1271.03,2223.53 ; v1(1435,2755) 1445.45,2744.55 R28.2@1493.46,2744.55 1493.46,2713.46 1476.58,2696.58 1448,2696.58 SB13.1@1447.01,2695.59 ; v1(1560,2505) 1562.94,2505 1574.62,2516.68 1574.62,2529.35 C26.1@1584.65,2539.37 1575.93,2548.09 1575.93,2563.36 1565,2574.29 1565,2594.29 1565.12,2594.41 U7.5@1565.12,2600.61 ; U4.32@1566.3,1776.29 1566.3,1751.09 1566.82,1750.58 1569.42,1750.58 1591.01,1728.99 1591.01,1694.85 1611.6,1674.26 C10.2@1611.84,1674.26 ; U7.12@1604.49,2672.46 1605,2672.97 1605,2690 1625.62,2710.62 1644.97,2710.62 1665.59,2731.24 1676.14,2741.79 R29.2@1676.14,2744.55 ; U7.8@1630.57,2607.01 1636.69,2607.01 1636.89,2606.8 1662.4,2606.8 1672.04,2597.17 C25.1@1709.98,2597.17 1709.98,2571.24 1720,2561.23 v1(1720,2560) ; U4.48@1642.29,2147.55 1642.8,2148.06 1678.06,2148.06 1687.39,2157.39 1724.99,2157.39 C11.2@1737.6,2170 ; v1(1695,2405) 1735.75,2405 R27.2@1738.03,2407.28 ; v1(1695,2465) 1737.66,2465 R26.2@1738.03,2464.63 ; v1@1848.11,2430.05 1887.05,2430.05 1887.25,2429.84 U8.3@1889.43,2429.84 ; v1(1860,2560) 1860,2556.85 1871.52,2545.32 1871.52,2542.07 1878.6,2535 1909.85,2535 C24.1@1911.18,2536.32 C27.1@1963.58,2536.32 1965,2534.91 1965,2510 1949.47,2494.47 U8.10@1949.47,2469.21 U8.9@1949.47,2449.53
  Top Layer w20: R4.2@142.62,1813.58 193.58,1813.58 v1(195,1815) ; R10.2@601.18,2478.74 602.12,2479.68 649.68,2479.68 v1(650,2480) ; C21.1@820.77,3177.17 828.49,3169.45 849.13,3169.45 849.29,3169.29 856.97,3176.97 U5.7@933.27,3176.97 U5.6@933.27,3232.09 U5.5@933.27,3287.2 ; v1(1080,2365) 1122.05,2322.95 SB5.1@1122.05,2283.46 ; v1(1215,2420) C12.2@1259.97,2420 ; C9.2@1221.82,1674.26 1225.38,1677.83 1225.38,1718.86 v1(1225.7,1719.17) ; R24.2@1358.27,415.94 C22.2@1358.27,332.68 1362.2,332.68 1383.86,354.33 U6.12@1440.94,354.33 ; v1(1500,2975) 1500.32,2975.32 1516.06,2975.32 1537.17,2996.42 1537.17,3004.68 1546.85,3014.37 R18.2@1555.12,3014.37 ; C10.2@1611.84,1674.26 1612.27,1674.68 1659.68,1674.68 v1(1660,1675) ; R29.2@1676.14,2744.55 1676.37,2744.77 1714.77,2744.77 v1(1715,2745) ; C11.2@1737.6,2170 1752.57,2184.97 1752.57,2212.57 v1(1775,2235) v1(1865,2235)
  Top Layer w40: SB3.2@452.76,1631.3 456.46,1635 v1(520,1635) ; C21.1@812.9,3169.29 815,3171.4 v1(815,3220) ; v1(1035,1680) 1038.31,1676.69 1106.69,1676.69 1110,1680 ; C12.2@1259.97,2420 C12.2@1261.19,2418.78 ; v1(1295,330) 1297.68,332.68 C22.2@1358.27,332.68
  Power w10: v1(1695,2465) 1810,2465 v1(1840,2435)
  Power w20: v1(195,1815) 375,1635 500,1635 v1(520,1635) ; v1(1295,330) 1295.32,329.68 1295.32,320.43 1350.37,265.37 ; J4.2@1556.69,59.06 1720,222.36 1720,270 ; v1@1560.76,2505 1655,2505 v1(1695,2465) ; v1(1715,2745) 1735,2725 1735,2637.72 1720,2622.72 v1(1720,2560) v1(1860,2560)
  Power w40: v1(815,3220) 770,3220 770,3260 747.74,3260 650,3162.26 v1(650,2480) 650,2295 520,2165 520,1975 ; v1(1295,330) 1160,465 1160,934.13 1066.43,1027.7 732.3,1027.7 560,1200 560,1330 490,1400 490,1605 v1(520,1635) ; 1355,270 1720,270 2044.88,594.88 J5.1@2244.09,594.88 J5.2@2244.09,694.88 ; v1(1500,2975) 1500,2830 1284.17,2614.17 1284.17,2452.6 1251.57,2420 v1(1215,2420) 1195.83,2400.83 1115.83,2400.83 v1(1080,2365) 910,2365 520,1975 ; v1(1720,2560) 1720,2552.74 1725.83,2546.91 1725.83,2513.09 1695,2482.26 v1(1695,2465) v1(1695,2405) 1775,2325 1775,2205 1659.17,2089.17 1659.17,1861.37 1660,1860.54 v1(1660,1675) 1635,1650 1290,1650 1225.7,1714.3 v1(1225.7,1719.17) 1074.17,1719.17 v1(1035,1680) 900,1680 855,1635 540,1635 v1(520,1635) ; v1@1865,2230.72 2045.86,2230.72 2189.96,2086.61 J3.1@2204.72,2086.61 ; v1(520,1635) 520,1975
+5V: C3.2 D1.1 JP1.2 Q1.1 R1.2 R3.2 U2.4 | length 1543
  Top Layer w20: R1.2@142.62,1597.05 146.26,1593.41 206.17,1593.41 v1(206.49,1593.09) ; D1.1@470.47,1200.79 470.47,1255.47 v1(485,1270) ; U2.4@937.55,1163.39 939.36,1161.57 955.19,1161.57 955.35,1161.42 C3.2@1003.4,1161.42
  Top Layer w40: D1.1@470.47,1200.79 470.47,1059.51 JP1.2@570.87,959.11 737.3,959.11 764.41,986.22 Q1.1@771.65,986.22 848.7,986.22 849.02,985.91 R3.2@849.02,984.25 849.33,984.57 849.33,1034.33 895,1080 950,1080 997.81,1127.81 997.81,1155.83 C3.2@1003.4,1161.42
  Power w20: v1(206.49,1593.09) 206.49,1471.61 413.38,1264.71 479.26,1264.71 484.55,1270 v1(485,1270)
AG_INT1: T15.1 U4.25 U7.4 | length 1041.9
  Top Layer w10: U4.25@1428.51,1776.29 1429.02,1775.77 1429.02,1742.47 1449.26,1722.23 1452.77,1722.23 v1(1455,1720) ; U7.4@1539.04,2607.01 1539.04,2540.96 v1(1540,2540)
  Bottom Layer w10: T15.1@1455,1670 v1(1455,1720) 1480,1745 1480,2476.85 1540,2536.85 v1(1540,2540)
AG_INT2: SB15.1 T16.1 U4.37 U7.9 | length 1046.4
  Top Layer w10: U7.9@1630.57,2626.69 1664.87,2626.69 1674.74,2636.57 SB15.1@1705.59,2636.57 1690,2652.16 v1(1690,2675) ; U4.37@1642.29,1931.01 1700.3,1931.01 v1(1700.61,1930.7)
  Bottom Layer w10: v1(1690,2675) 1689.24,2674.24 1674.24,2674.24 1654.17,2654.17 1654.17,1977.14 v1(1700.61,1930.7) 1754.46,1930.7 1754.54,1930.62 1769.38,1930.62 T16.1@1775,1925
AG_SCL: R29.1 T6.1 U4.61 U7.13 | length 1061.8
  Top Layer w10: v1(1285,2750) 1375,2840 1565.93,2840 T6.1@1604.49,2801.44 1604.49,2793.49 1611.57,2786.4 1611.57,2741.79 1585,2715.21 1585,2710 1584.8,2709.8 U7.13@1584.8,2672.46 ; v1(1323.94,2281.8) 1323.94,2278.64 1330.08,2272.5 U4.61@1330.08,2223.53
  Bottom Layer w10: v1(1285,2750) 1285,2540 1299.17,2525.83 1299.17,2524.3 1314.3,2509.17 1315.83,2509.17 1323.94,2501.06 v1(1323.94,2281.8)
AG_SDA: R28.1 T7.1 U4.62 U7.14 | length 1042.5
  Top Layer w10: v1(1295,2310) 1295,2274.21 1309.89,2259.33 1309.89,2224.04 U4.62@1310.4,2223.53 ; v1(1374.86,2635) 1374.86,2736.86 1439.44,2801.44 T7.1@1547.11,2801.44 1547.11,2793.49 1558.03,2782.57 1558.03,2708.55 1565.12,2701.47 U7.14@1565.12,2672.46
  Bottom Layer w10: v1(1295,2310) 1295,2260 1310.86,2244.14 1349.14,2244.14 1375,2270 1375,2634.85 v1(1374.86,2635)
AGND: C13.1 SB7.2 U4.12 | length 192.3
  Top Layer w10: C13.1@1105,1912.4 1137.4,1912.4 1155.5,1930.5 1194.53,1930.5 U4.12@1195.04,1931.01
  Top Layer w20: SB7.2@1035,1853.62 1035,1853.94 1077.87,1896.81 1089.41,1896.81 C13.1@1105,1912.4
AVDD: C13.2 SB6.2 U4.13 | length 226.3
  Top Layer w10: C13.2@1105,1837.6 1108.94,1837.6 1147.53,1876.19 1147.53,1897.11 1161.23,1910.81 1194.53,1910.81 U4.13@1195.04,1911.33
  Top Layer w20: C13.2@1105,1837.6 1109.4,1833.19 1109.4,1746